# Altium PCB NewTrackerIRLED.PcbDoc
Units mm, origin at the board's own origin, x right, y up, seen from the top; angles counter-clockwise.
Board outline 54 x 54 mm, 2 copper layers (Top Layer, Bottom Layer); 21 components, 18 nets, 55 pads, 0 vias.
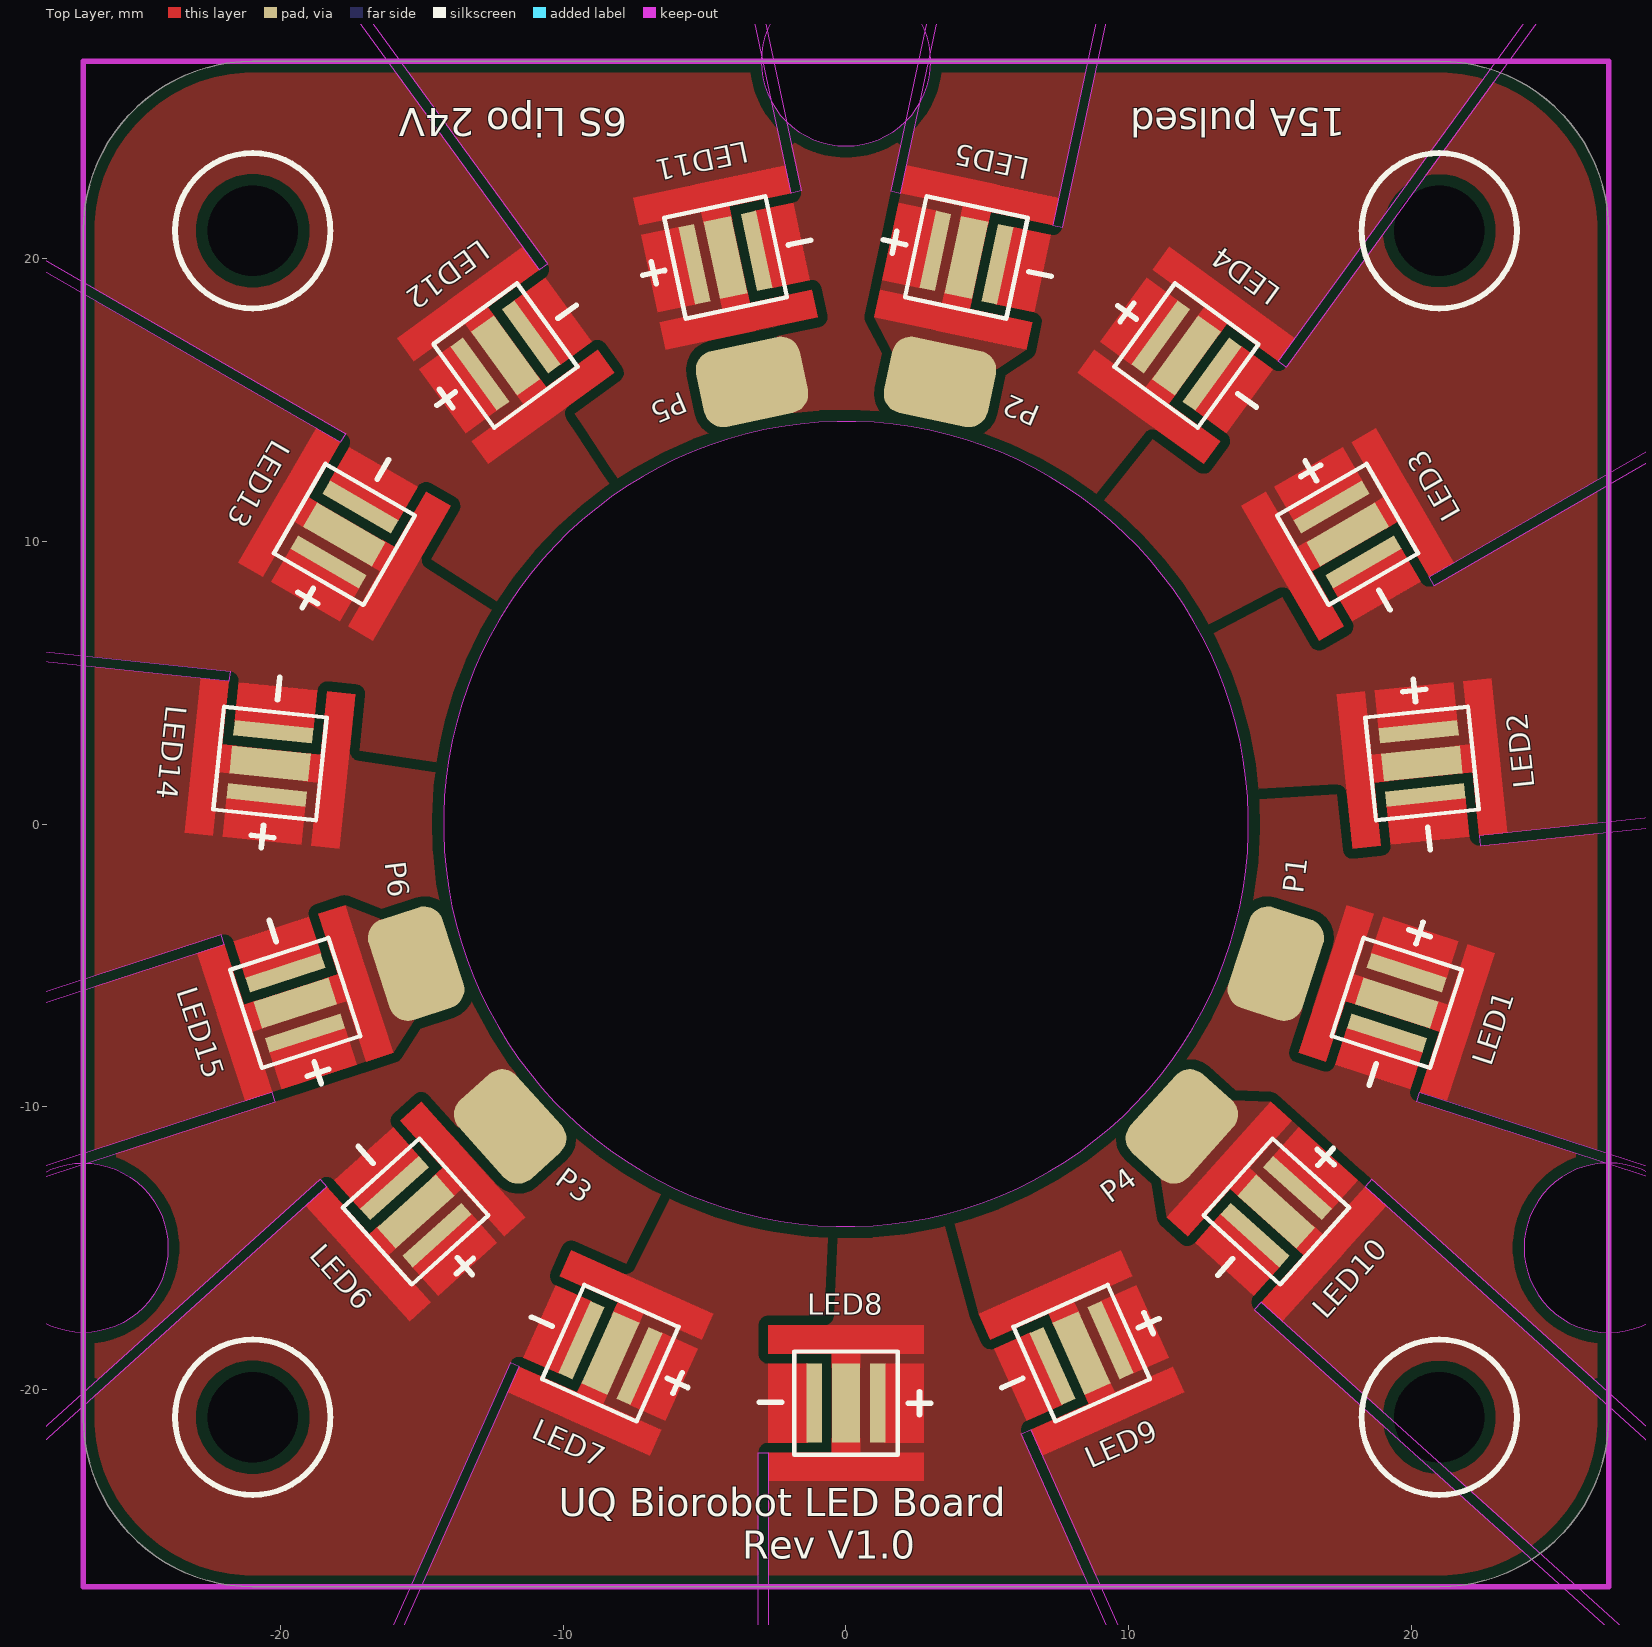
[diagram p0: Top Layer view]
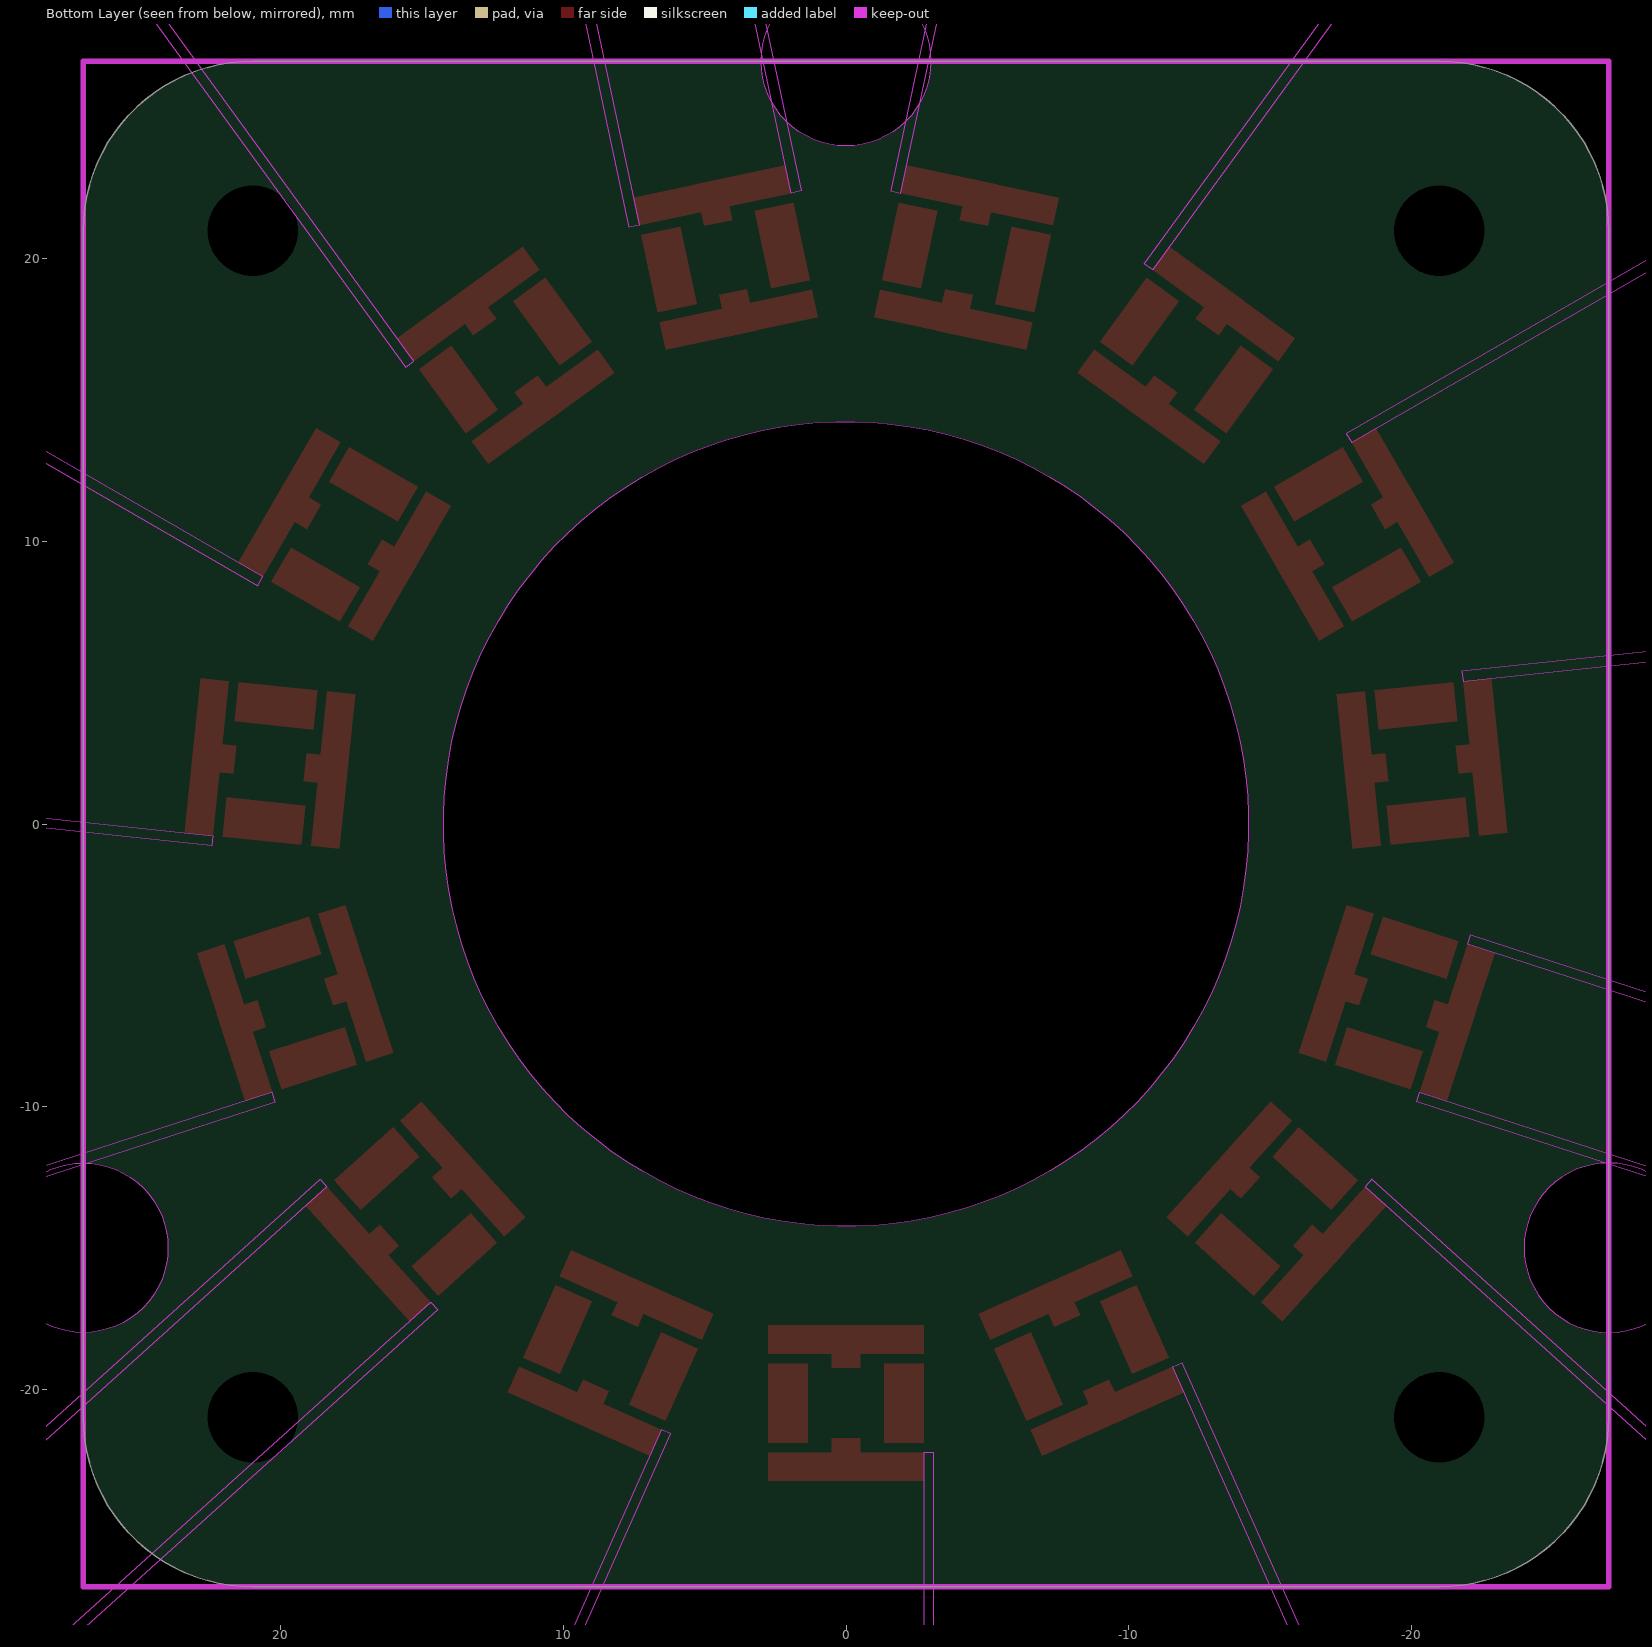
[diagram p1: Bottom Layer view, seen from below]
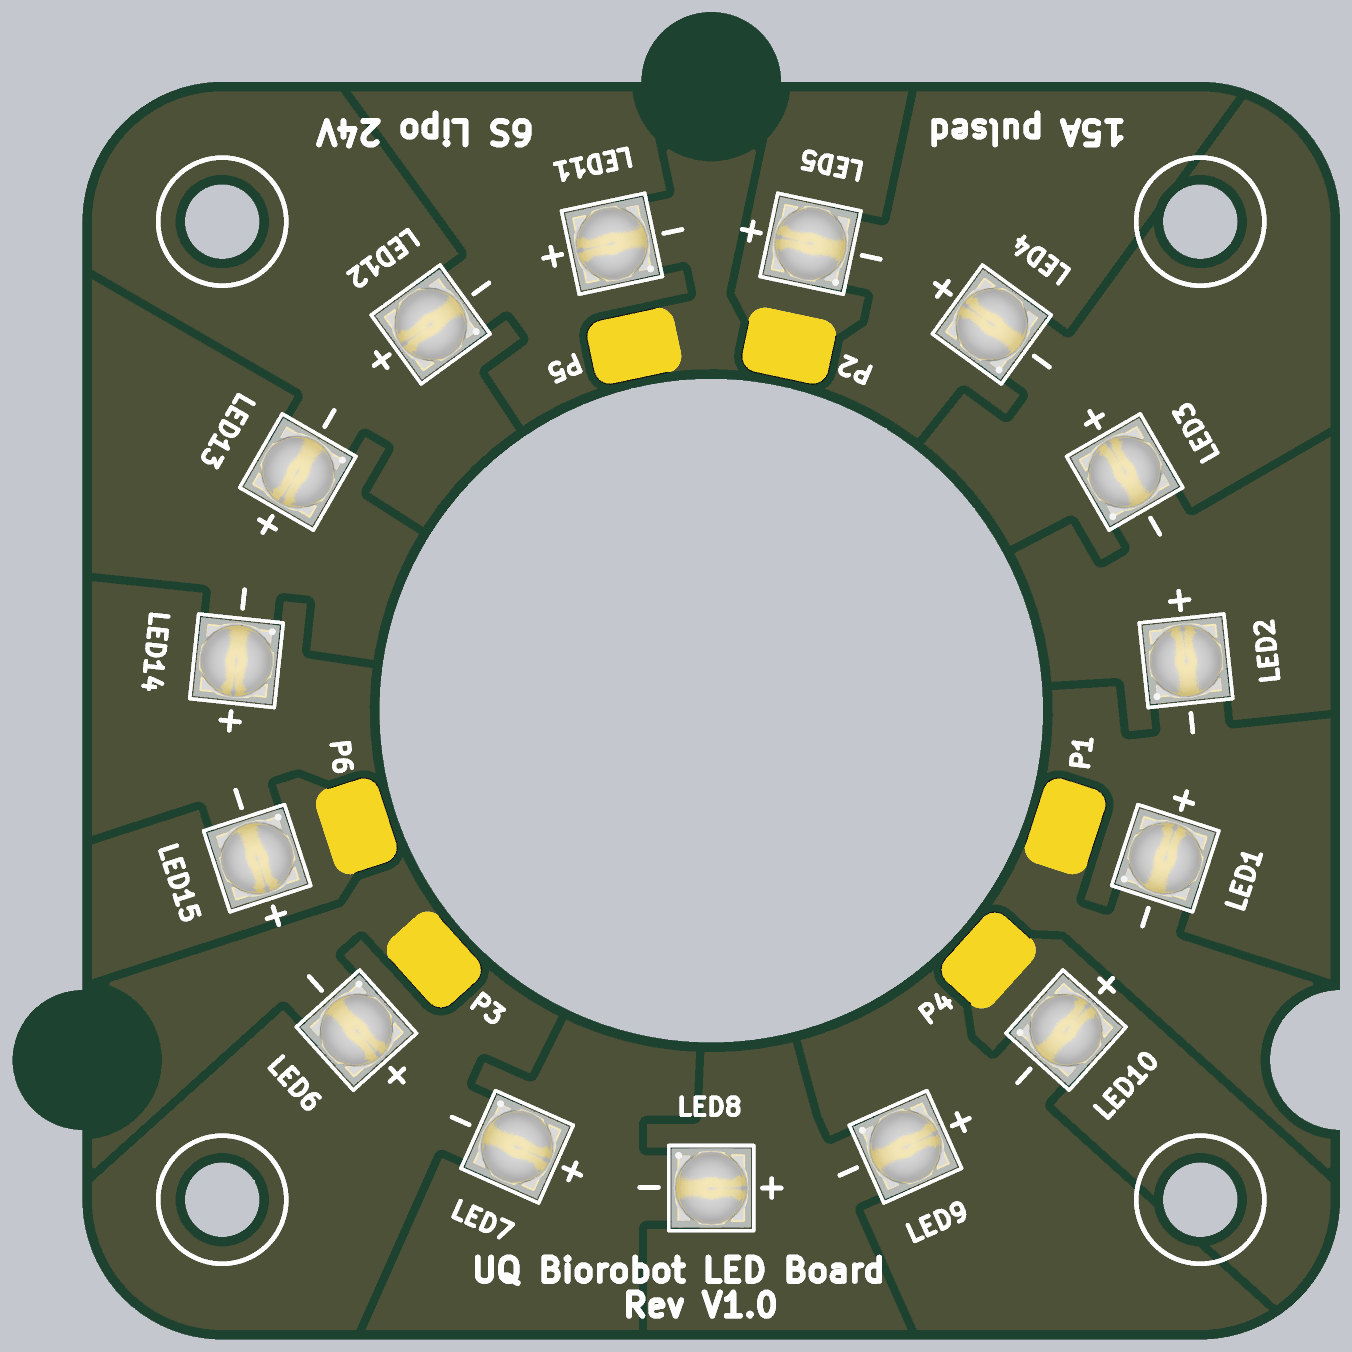
[diagram p2: 3D render of the assembled board from above, using the file's embedded part models]

## Layer stack, top to bottom
Top Solder: solder mask 0.0102, Solder Resist, Dk 3.5
Top Layer: signal copper 0.0356
Dielectric 1: dielectric 0.32, FR-4, Dk 4.8
Bottom Layer: signal copper 0.0356
Bottom Solder: solder mask 0.0102, Solder Resist, Dk 3.5

## Board outline
-27,-21 -27,21 cw(c-21,21) -21,27 21,27 cw(c21,21) 27,21 27,-21 cw(c21,-21) 21,-27 -21,-27 cw(c-21,-21)
cut-out: -13.939,2.963 ccw(c0,0) -2.963,-13.939 ccw(c0,0) 13.939,-2.963 ccw(c0,0) 2.963,13.939 ccw(c0,0)
cut-out: 24,-15 ccw(c27,-15) 27,-18 ccw(c27,-15) 30,-15 ccw(c27,-15) 27,-12 ccw(c27,-15)
cut-out: -3,27 ccw(c0,27) 0,24 ccw(c0,27) 3,27 ccw(c0,27) 0,30 ccw(c0,27)
cut-out: -30,-15 cw(c-27,-15) -27,-12 cw(c-27,-15) -24,-15 cw(c-27,-15) -27,-18 cw(c-27,-15)

## Design rules (kind name [scope] priority, off if disabled: settings)
BoardOutlineClearance [All] p1: gap=0.2 ignorepadtopadclearanceinfootprint=FALSE except(0.4: Fill-OutlineEdge Fill-CavityEdge Fill-CutoutEdge Fill-SplitBarrior Fill-SplitContinuation Poly-OutlineEdge Poly-CavityEdge Poly-CutoutEdge Poly-SplitBarrior Poly-SplitContinuation Region-OutlineEdge Region-CavityEdge Region-CutoutEdge Region-SplitBarrior Region-SplitContinuation)
Clearance [All] p1: gap=0.127 ignorepadtopadclearanceinfootprint=FALSE except(0.102: Arc-Text Track-Text SMDPad-Text THPad-Text Fill-Text Poly-Text Region-Text Text-Text; 0.12: Arc-Arc Arc-Track Track-Track; 0.15: Arc-SMDPad Arc-Via Track-SMDPad Track-Via SMDPad-SMDPad SMDPad-THPad THPad-THPad; 0.2: Arc-THPad Track-THPad; 0.25: Arc-Hole Track-Hole SMDPad-Hole THPad-Hole Via-Hole Fill-Hole Poly-Hole Region-Hole Text-Hole; 0.35: SMDPad-Fill SMDPad-Poly SMDPad-Region Fill-Fill Fill-Poly Fill-Region Poly-Poly Poly-Region Region-Region; 0.4: THPad-Fill THPad-Poly THPad-Region)
DiffPairsRouting [InDifferentialPairClass('USBCONN_DIFF')] p1: maxlimit=0.127 minlimit=0.127 mostfreqgap=0.127 toplayer_minwidth=0.2 toplayer_maxwidth=0.2 toplayer_prefwidth=0.2 bottomlayer_minwidth=0.2 bottomlayer_maxwidth=0.2 bottomlayer_prefwidth=0.2 impedanceprofiledriven=TRUE maxuncoupledlength=12.7
HoleSize [All] p1: absolutevalues=TRUE maxlimit=6.3 minlimit=0.2 maxpercent=80.000 minpercent=20.000
HoleToHoleClearance [All] p1: gap=0.25 allowstackedmicrovias=FALSE
MinimumAnnularRing [All] p1: minimumring=0.12
MinimumSolderMaskSliver [All] p1: minsoldermaskwidth=0.1
PlaneClearance [All] p1: clearance=0.15
PlaneConnect PlaneConnectPowerPads [InPadClass('PowerPads')] p1: planeconnectstyle=Direct reliefexpansion=0.508 reliefentries=4 reliefconductorwidth=0.254 reliefairgap=0.254
PlaneConnect [All] p2: planeconnectstyle=Direct reliefexpansion=0.3 reliefentries=4 reliefconductorwidth=1 reliefairgap=0.102
PolygonConnect PolygonConnectPowerPads [All vs (InPadClass('PowerPads'))] p1: connectstyle=Direct reliefconductorwidth=0.254 reliefentries=4 polygonreliefangle="90 Angle" airgapwidth=0.254
PolygonConnect [All] p2: connectstyle=Direct reliefconductorwidth=0.5 reliefentries=4 polygonreliefangle="90 Angle" airgapwidth=0.102
RoutingVias [All] p1: holewidth=0.2 width=0.45 viastyle="Through Hole" minholewidth=0.2 minwidth=0.45 maxholewidth=0.2 maxwidth=0.45
SilkToSilkClearance [All] p1: silktosilkclearance=0
SilkToSolderMaskClearance [IsPad] p1: minsilkscreentomaskgap=0.102 clearancetoexposedcopper=TRUE
SolderMaskExpansion SolderMaskExpansion_1 [IsVia] p1: expansion=0.102 istentingtop=TRUE
SolderMaskExpansion [All] p2: expansion=0.075 istentingtop=FALSE
Width [All] p1: maxlimit=0.8 minlimit=0.102 preferedwidth=0.2 minimp=50.000000 maximp=50.000000 favimp=50.000000
22 further rules are at their usual default settings.

## Components (designator, comment, footprint, x,y, rotation, side; value= is the part's Value field where it differs from the comment)
LED1 "VSMA1094250X02" DIODE_VSMA1085400_VIS 19.497,-6.335 r72 top
LED2 "VSMA1094250X02" DIODE_VSMA1085400_VIS 20.388,2.143 r96 top
LED3 "VSMA1094250X02" DIODE_VSMA1085400_VIS 17.753,10.25 r120 top
LED4 "VSMA1094250X02" DIODE_VSMA1085400_VIS 12.05,16.585 r144 top
LED5 "VSMA1094250X02" DIODE_VSMA1085400_VIS 4.262,20.052 r168 top
LED6 "VSMA1094250X02" DIODE_VSMA1085400_VIS -15.234,-13.717 r312 top
LED7 "VSMA1094250X02" DIODE_VSMA1085400_VIS -8.338,-18.728 r336 top
LED8 "VSMA1094250X02" DIODE_VSMA1085400_VIS 0,-20.5 r0 top
LED9 "VSMA1094250X02" DIODE_VSMA1085400_VIS 8.338,-18.728 r24 top
LED10 "VSMA1094250X02" DIODE_VSMA1085400_VIS 15.234,-13.717 r48 top
LED11 "VSMA1094250X02" DIODE_VSMA1085400_VIS -4.262,20.052 r192 top
LED12 "VSMA1094250X02" DIODE_VSMA1085400_VIS -12.05,16.585 r216 top
LED13 "VSMA1094250X02" DIODE_VSMA1085400_VIS -17.753,10.25 r240 top
LED14 "VSMA1094250X02" DIODE_VSMA1085400_VIS -20.388,2.143 r264 top
LED15 "VSMA1094250X02" DIODE_VSMA1085400_VIS -19.497,-6.335 r288 top
P1 "3x2.5mm SOLDER_PAD" SOLDER_PAD_SMD 15.217,-4.944 r342 top
P2 "3x2.5mm SOLDER_PAD" SOLDER_PAD_SMD 3.327,15.65 r78 top
P3 "3x2.5mm SOLDER_PAD" SOLDER_PAD_SMD -11.89,-10.706 r222 top
P4 "3x2.5mm SOLDER_PAD" SOLDER_PAD_SMD 11.89,-10.706 r318 top
P5 "3x2.5mm SOLDER_PAD" SOLDER_PAD_SMD -3.327,15.65 r102 top
P6 "3x2.5mm SOLDER_PAD" SOLDER_PAD_SMD -15.217,-4.944 r198 top

## Footprints (in the part's own frame and the unit in brackets; to place one, negate y for a bottom-side part, rotate by r counter-clockwise, add the part's x,y. Pads: shape width x height; smd on the part's side, far side on the other; paste and mask are expansions set on the pad)
DIODE_VSMA1085400_VIS [mm]
  rect 1x2.8 smd paste-0.5 mask+0.051: A1(0,0)
  rect 0.55x2.8 smd paste-0.025 mask+0.051: A2(1.125,0) C(-1.125,0)
  Top Layer region: -2.75,2.75 -2.75,1.75 0.5,1.75 0.5,2.75
  Top Layer region: -2.75,-1.75 -2.75,-2.75 0.5,-2.75 0.5,-1.75
  Top Layer region: 0,1.4 0,1.4 0,1.4 0,1.4 0,1.4 0,1.4 0,1.4 0,1.4
  Top Layer region: 0,-1.4 0,-1.4 0,-1.4 0,-1.4 0,-1.4 0,-1.4 0,-1.4 0,-1.4
  Top Layer region: 1.35,1.4 2.75,1.4 2.75,-1.4 1.35,-1.4
  Top Layer region: -2.75,1.4 -1.35,1.4 -1.35,-1.4 -2.75,-1.4
  Top Layer region: -0.5,1.25 0.5,1.25 0.5,1.75 -0.5,1.75
  Top Layer region: -0.5,-1.75 0.5,-1.75 0.5,-1.25 -0.5,-1.25
  Top Layer region: -0.5,2.75 -0.5,1.75 2.75,1.75 2.75,2.75
  Top Layer region: -0.5,-1.75 -0.5,-2.75 2.75,-2.75 2.75,-1.75
  silkscreen extent -3.07,-1.83 3,1.83, body extent -1.7,-1.7 1.7,1.7, height 2.91
SOLDER_PAD_SMD [mm]
  rrect50% 2.75x3.75 smd paste-100 mask+0.051: 1(0,0)

## Part data
LED1 LED2 LED3 LED4 LED5 LED6 LED7 LED8 LED9 LED10 LED11 LED12 LED13 LED14 LED15: "Infrared Emitters - High Power HIPOW IR EMITTING DIODE 940NM -E3", Manufacturer=Vishay, Supplier Part Number 1=751-VSMA1094250X02CT-ND, Category=Optoelectronics, ComponentLink1Description=https://datasheet.octopart.com:443/VSMA1094250X02-Vishay-datasheet-177116671.pdf?src-supplier=Future+Electronics, ComponentLink1URL=https://datasheet.octopart.com:443/VSMA1094250X02-Vishay-datasheet-177116671.pdf?src-supplier=Future+Electronics, ComponentLink2Description=http://sigma.octopart.com:80/rohs_statement/Vishay-company-15.pdf?src-supplier=Compliance+Statements, ComponentLink2URL=http://sigma.octopart.com:80/rohs_statement/Vishay-company-15.pdf?src-supplier=Compliance+Statements, Country of Origin="Mainland China", Harmonized Tariff Schedule (HTS) Code=8541.40.20.00, Introduction Date=2024-04-30, Lifecycle Status=Production, Manufacturer Part Number=VSMA1094250X02, Pricing 1="1=3.36, 10=2.456, 100=1.9169 (USD)", RoHS=Compliant, Stock 1=362, Supplier 1=DigiKey, Viewing Angle=28°, Wavelength=940nm
P1 P2 P3 P4 P5 P6: library part "3x2.5mm SMD_SOLDER_PAD", "Plated SMD 3x2.5mm SOLDER_PAD"

## Free pads (board coordinates)
  round 0 hole 3.2 unplated mask+0.051: 1(-21,21) 2(21,21) 3(21,-21) 4(-21,-21)

## Nets (pads, with @x,y where several pads share a name; then routed paths per layer and width w, separated by ;. In a path a pad name is that pad's centre, name@x,y a point inside that pad or via, vN(x,y) a via of type N, cw(c..) or ccw(c..) an arc to the next point about the centre after c; other vN are vias at no path point)
CHAIN_A: LED1.C P1.1
CHAIN_B: LED6.C P3.1
CHAIN_C: LED11.C P5.1
L1: LED4.A1 LED4.A2 LED5.C
L2: LED3.A1 LED3.A2 LED4.C
L3: LED2.A1 LED2.A2 LED3.C
L4: LED1.A1 LED1.A2 LED2.C
L5: LED9.A1 LED9.A2 LED10.C
L6: LED8.A1 LED8.A2 LED9.C
L7: LED7.A1 LED7.A2 LED8.C
L8: LED6.A1 LED6.A2 LED7.C
L9: LED14.A1 LED14.A2 LED15.C
L10: LED13.A1 LED13.A2 LED14.C
L11: LED12.A1 LED12.A2 LED13.C
L12: LED11.A1 LED11.A2 LED12.C
VBAT_A: LED5.A1 LED5.A2 P2.1
VBAT_B: LED10.A1 LED10.A2 P4.1
VBAT_C: LED15.A1 LED15.A2 P6.1

## Polygon pours and split planes (outlines as drawn)
L5 on Top Layer "NONET_L-01_P-001" (solid, pour order 51): 0,0 13.625,-13.412 12.359,-14.829 10.281,-16.33 9.732,-15.097 4.707,-17.334
L4 on Top Layer "NONET_L-01_P-001" (solid, pour order 80): 21.23,0.188 22.453,-0.764 45.723,1.682 44.409,-17.321 21.262,-9.8 22.962,-4.569 20.804,-3.868
L12 on Top Layer "NONET_L-01_P-001" (solid, pour order 68): -10.632,19.341 -10.565,19.827 -24.318,38.757 -7.204,47.12 -2.144,23.314 -7.524,22.17 -7.243,20.85
CHAIN_C on Top Layer "NONET_L-01_P-001" (solid, pour order 69): -1.713,23 -6.839,47.12 6.803,46.947 1.713,23
CHAIN_C on Top Layer "Top Layer-CHAIN_C" (solid, pour order 39): -1.001,17.934 -2.451,17.242 -1.879,14.552 1.776,14.583 1.35,15.368 1.635,16.713 1.001,17.934 2.144,23.314 -2.144,23.314 -1.863,21.993
CHAIN_A on Top Layer "CHAIN_A_L01_P054" (solid, pour order 54): 16.031,-8.1 16.158,-6.499 13.542,-5.649 11.741,-8.829 12.634,-8.853 13.656,-9.773 15.031,-9.833 19.118,-13.514 21.262,-9.8 19.978,-9.383
CHAIN_A on Top Layer "NONET_L-01_P-001" (solid, pour order 81): 20.6,-9.96 44.227,-17.637 37.256,-29.365 18.926,-12.86
VBAT_B on Top Layer "NONET_L-01_P-001" (solid, pour order 0): 11.351,-13.921 11.147,-12.56 13.656,-9.773 15.031,-9.833
VBAT_B on Top Layer "NONET_L-01_P-001" (solid, pour order 1): 19.118,-13.514 37.074,-29.681 31.446,-32.014 15.438,-17.601
L5 on Top Layer "NONET_L-01_P-001" (solid, pour order 2): 12.354,-14.824 10.281,-16.33 11.42,-18.888 14.435,-16.698
L6 on Top Layer "NONET_L-01_P-001" (solid, pour order 3): 5.256,-18.567 2.75,-19.1 2.75,-21.9 6.395,-21.125
L5 on Top Layer "NONET_L-01_P-001" (solid, pour order 4): 10.281,-16.33 10.139,-16.01 7.953,-16.983 9.377,-20.181 11.562,-19.208
L7 on Top Layer "NONET_L-01_P-001" (solid, pour order 5): -2.75,-19.1 -5.256,-18.567 -6.395,-21.125 -2.75,-21.9
L7 on Top Layer "NONET_L-01_P-001" (solid, pour order 6): -5.256,-18.567 -5.114,-18.247 -7.261,-17.292 -8.684,-20.489 -6.538,-21.445
L8 on Top Layer "NONET_L-01_P-001" (solid, pour order 9): -10.281,-16.33 -12.354,-14.824 -14.435,-16.698 -11.42,-18.888
L8 on Top Layer "NONET_L-01_P-001" (solid, pour order 10): -12.354,-14.824 -12.094,-14.59 -13.688,-12.819 -16.289,-15.161 -14.695,-16.932
VBAT_B on Top Layer "NONET_L-01_P-001" (solid, pour order 11): 15.031,-9.833 19.118,-13.514 16.944,-15.929 12.856,-12.249
VBAT_C on Top Layer "NONET_L-01_P-001" (solid, pour order 12): -16.45,-3.373 -17.731,-2.87 -16.031,-8.1 -15.291,-6.94
VBAT_C on Top Layer "NONET_L-01_P-001" (solid, pour order 13): -17.036,-5.01 -22.267,-6.709 -21.262,-9.8 -16.031,-8.1
L6 on Top Layer "NONET_L-01_P-001" (solid, pour order 14): 2.75,-17.75 2.75,-23.25 -0.5,-23.25 -0.5,-17.75
VBAT_A on Top Layer "NONET_L-01_P-001" (solid, pour order 15): 6.38,16.79 5.34,16.097 1.635,16.713 1.001,17.934
VBAT_A on Top Layer "NONET_L-01_P-001" (solid, pour order 16): 4.179,17.258 5.323,22.638 2.144,23.314 1.001,17.934
L9 on Top Layer "NONET_L-01_P-001" (solid, pour order 17): -19.015,-3.287 -19.283,-0.738 -17.94,-0.88 -17.6,2.353 -23.07,2.928 -23.41,-0.305 -22.067,-0.446 -21.678,-4.152
L10 on Top Layer "NONET_L-01_P-001" (solid, pour order 18): -18.708,4.731 -17.916,7.168 -16.747,6.493 -15.122,9.308 -19.885,12.058 -21.51,9.243 -20.341,8.568 -21.493,5.024
L11 on Top Layer "NONET_L-01_P-001" (solid, pour order 19): -15.166,11.932 -13.451,13.836 -12.658,12.744 -10.029,14.654 -13.262,19.104 -15.891,17.193 -15.097,16.101 -17.591,13.332
L12 on Top Layer "NONET_L-01_P-001" (solid, pour order 20): -6.38,16.79 -3.201,17.466 -4.345,22.846 -7.524,22.17 -7.243,20.85 -10.648,19.334 -9.002,17.069 -6.661,18.111
L1 on Top Layer "NONET_L-01_P-001" (solid, pour order 21): 6.661,18.111 9.002,17.069 8.208,15.976 10.838,14.066 14.07,18.516 11.441,20.426 10.648,19.334 7.243,20.85
L2 on Top Layer "NONET_L-01_P-001" (solid, pour order 22): 13.451,13.836 15.166,11.932 13.997,11.257 15.622,8.442 20.385,11.192 18.76,14.007 17.591,13.332 15.097,16.101
L3 on Top Layer "NONET_L-01_P-001" (solid, pour order 23): 17.916,7.168 18.708,4.731 17.365,4.59 17.705,1.358 23.175,1.933 22.835,5.165 21.493,5.024 20.341,8.568
L4 on Top Layer "NONET_L-01_P-001" (solid, pour order 38): 19.283,-0.738 19.015,-3.287 17.731,-2.87 16.727,-5.961 21.958,-7.66 22.962,-4.569 21.678,-4.152 22.067,-0.446
L12 on Top Layer "NONET_L-01_P-001" (solid, pour order 40): 0,0 -10.539,15.952 -9.006,17.074 -6.661,18.111 -6.38,16.79 -1.001,17.934
L11 on Top Layer "NONET_L-01_P-001" (solid, pour order 41): 0,0 -16.116,10.286 -15.172,11.935 -13.451,13.836 -12.658,12.744 -8.208,15.976
L10 on Top Layer "NONET_L-01_P-001" (solid, pour order 42): 0,0 -18.906,2.842 -18.708,4.731 -17.916,7.168 -16.747,6.493 -13.997,11.257
L9 on Top Layer "NONET_L-01_P-001" (solid, pour order 43): 0,0 -18.428,-5.094 -19.021,-3.289 -19.283,-0.738 -17.94,-0.88 -17.365,4.59
CHAIN_B on Top Layer "Top Layer-CHAIN_B" (solid, pour order 44): -15.031,-9.833 -13.707,-10.744 -11.663,-8.904 -13.517,-5.754 -13.984,-6.515 -15.291,-6.94 -16.031,-8.1 -21.262,-9.8 -19.118,-13.514 -18.115,-12.61
L8 on Top Layer "NONET_L-01_P-001" (solid, pour order 45): 0,0 -8.545,-17.103 -10.284,-16.336 -12.354,-14.824 -11.351,-13.921 -15.031,-9.833
L7 on Top Layer "NONET_L-01_P-001" (solid, pour order 47): 0,0 -0.85,-19.1 -2.75,-19.107 -5.256,-18.567 -4.707,-17.334 -9.732,-15.097
L6 on Top Layer "NONET_L-01_P-001" (solid, pour order 53): 0,0 6.992,-17.794 5.256,-18.567 2.75,-19.1 2.75,-17.75 -2.75,-17.75
L4 on Top Layer "NONET_L-01_P-001" (solid, pour order 55): 0,0 19.084,1.151 19.29,-0.738 19.015,-3.287 17.731,-2.87 16.031,-8.1
L3 on Top Layer "NONET_L-01_P-001" (solid, pour order 56): 0,0 16.966,8.814 17.922,7.172 18.708,4.731 17.365,4.59 17.94,-0.88
L2 on Top Layer "NONET_L-01_P-001" (solid, pour order 62): 0,0 11.914,14.953 13.451,13.836 15.166,11.932 13.997,11.257 16.747,6.493
L1 on Top Layer "NONET_L-01_P-001" (solid, pour order 66): 0,0 4.803,18.506 6.662,18.118 9.002,17.069 8.208,15.976 12.658,12.744
L11 on Top Layer "NONET_L-01_P-001" (solid, pour order 67): -17.58,13.344 -17.716,13.816 -37.418,25.191 -24.607,38.547 -11.441,20.426 -15.891,17.193 -15.097,16.101
VBAT_A on Top Layer "NONET_L-01_P-001" (solid, pour order 70): 2.144,23.314 7.168,46.947 12.002,43.24 7.524,22.17
L10 on Top Layer "NONET_L-01_P-001" (solid, pour order 71): -21.493,5.024 -21.803,5.416 -47.2,8.085 -37.596,24.882 -18.76,14.007 -21.51,9.243 -20.341,8.568
L9 on Top Layer "NONET_L-01_P-001" (solid, pour order 72): -21.678,-4.152 -22.121,-3.921 -43.558,-10.886 -47.238,7.73 -22.835,5.165 -23.41,-0.305 -22.067,-0.446 -21.68,-4.135
L7 on Top Layer "NONET_L-01_P-001" (solid, pour order 73): -2.767,-21.896 -3.107,-22.25 -3.107,-45 -21.079,-40.583 -11.969,-20.121 -6.944,-22.358 -6.395,-21.125
L8 on Top Layer "NONET_L-01_P-001" (solid, pour order 74): -11.434,-18.878 -11.888,-19.063 -21.405,-40.438 -37.205,-29.799 -19.118,-13.514 -15.438,-17.601 -14.435,-16.698
CHAIN_B on Top Layer "NONET_L-01_P-001" (solid, pour order 75): -18.926,-12.86 -37.387,-29.483 -44.059,-17.582 -20.6,-9.96
VBAT_C on Top Layer "NONET_L-01_P-001" (solid, pour order 76): -21.262,-9.8 -44.241,-17.266 -43.448,-11.226 -22.962,-4.569
L6 on Top Layer "NONET_L-01_P-001" (solid, pour order 77): 6.395,-21.125 6.212,-21.59 16.598,-44.919 -2.75,-45 -2.75,-23.25 2.75,-23.25 2.75,-21.9
L5 on Top Layer "NONET_L-01_P-001" (solid, pour order 78): 14.435,-16.698 14.456,-17.197 31.207,-32.28 16.924,-44.774 6.944,-22.358 11.969,-20.121 11.42,-18.888 14.421,-16.708
L3 on Top Layer "NONET_L-01_P-001" (solid, pour order 79): 20.346,8.552 20.822,8.434 40.525,19.809 45.686,2.037 23.41,-0.305 22.835,5.165 21.493,5.024
L2 on Top Layer "NONET_L-01_P-001" (solid, pour order 82): 15.097,16.101 15.592,16.174 30.602,36.834 40.346,20.118 21.51,9.243 18.76,14.007 17.591,13.332
L1 on Top Layer "NONET_L-01_P-001" (solid, pour order 83): 7.243,20.85 7.665,21.118 12.351,43.166 30.313,37.044 15.891,17.193 11.441,20.426 10.648,19.334 7.259,20.843

## Keep-outs
Keep-Out Layer:
  pour cut-out: 14.695,-16.932 14.456,-17.197 31.207,-32.28 31.446,-32.014
  pour cut-out: 6.212,-21.59 6.538,-21.445 16.924,-44.774 16.598,-44.919
  pour cut-out: 37.256,-29.365 18.614,-12.579 18.375,-12.844 37.074,-29.681
  pour cut-out: 20.201,-9.83 20.311,-9.491 44.409,-17.321 44.227,-17.637
  pour cut-out: 22.416,-0.409 22.453,-0.764 45.723,1.682 45.686,2.037
  pour cut-out: 20.822,8.434 20.644,8.743 40.346,20.118 40.525,19.809
  pour cut-out: 15.592,16.174 15.303,16.384 30.313,37.044 30.602,36.834
  pour cut-out: -21.803,5.416 -21.841,5.061 -47.238,7.73 -47.2,8.085
  pour cut-out: -17.716,13.816 -17.894,13.507 -37.596,24.882 -37.418,25.191
  pour cut-out: -10.853,19.617 -10.565,19.827 -24.318,38.757 -24.607,38.547
  pour cut-out: -1.587,22.41 -1.936,22.336 -7.204,47.12 -6.839,47.12
  pour cut-out: 6.803,46.947 1.587,22.41 1.936,22.336 7.168,46.947
  pour cut-out: 7.316,21.192 7.665,21.118 12.351,43.166 12.002,43.24
  pour cut-out: -3.107,-22.25 -2.75,-22.25 -2.75,-45 -3.107,-45
  pour cut-out: -11.562,-19.208 -11.888,-19.063 -21.405,-40.438 -21.079,-40.583
  pour cut-out: -18.614,-12.579 -18.375,-12.844 -37.205,-29.799 -37.387,-29.483
  pour cut-out: -44.059,-17.582 -20.201,-9.83 -20.311,-9.491 -44.241,-17.266
  pour cut-out: -22.011,-4.26 -22.121,-3.921 -43.558,-10.886 -43.448,-11.226
  lines w0.2: -27,-27 -27,27 27,27 27,-27 -27,-27

## Silkscreen, mask and mechanical layers (free items; w line width, h text height)
Top Overlay:
  circle w0.2: c21,21 r2.75
  circle w0.2: c-21,21 r2.75
  circle w0.2: c-21,-21 r2.75
  circle w0.2: c21,-21 r2.75
  text "6S Lipo 24V" at -7.752,25.333 h1 r180
  text "15A pulsed" at 17.665,25.333 h1 r180
  text "UQ Biorobot LED Board" at -10.163,-24.5 h1
  text "Rev V1.0" at -3.665,-26 h1
Mechanical 13:
  circle w0.2: c0,27 r3
  circle w0.2: c-27,-15 r3
  circle w0.2: c27,-15 r3
  circle w0.2: c27,-15 r3
  circle w0.2: c0,0 r14.25
  lines w0.2: -27,-21 ccw(c-21,-21) -21,-27 21,-27 ccw(c21,-21) 27,-21 27,21 ccw(c21,21) 21,27 -21,27 ccw(c-21,21) -27,21 -27,-21